# Allegro board mib_tongue2_m13.brd
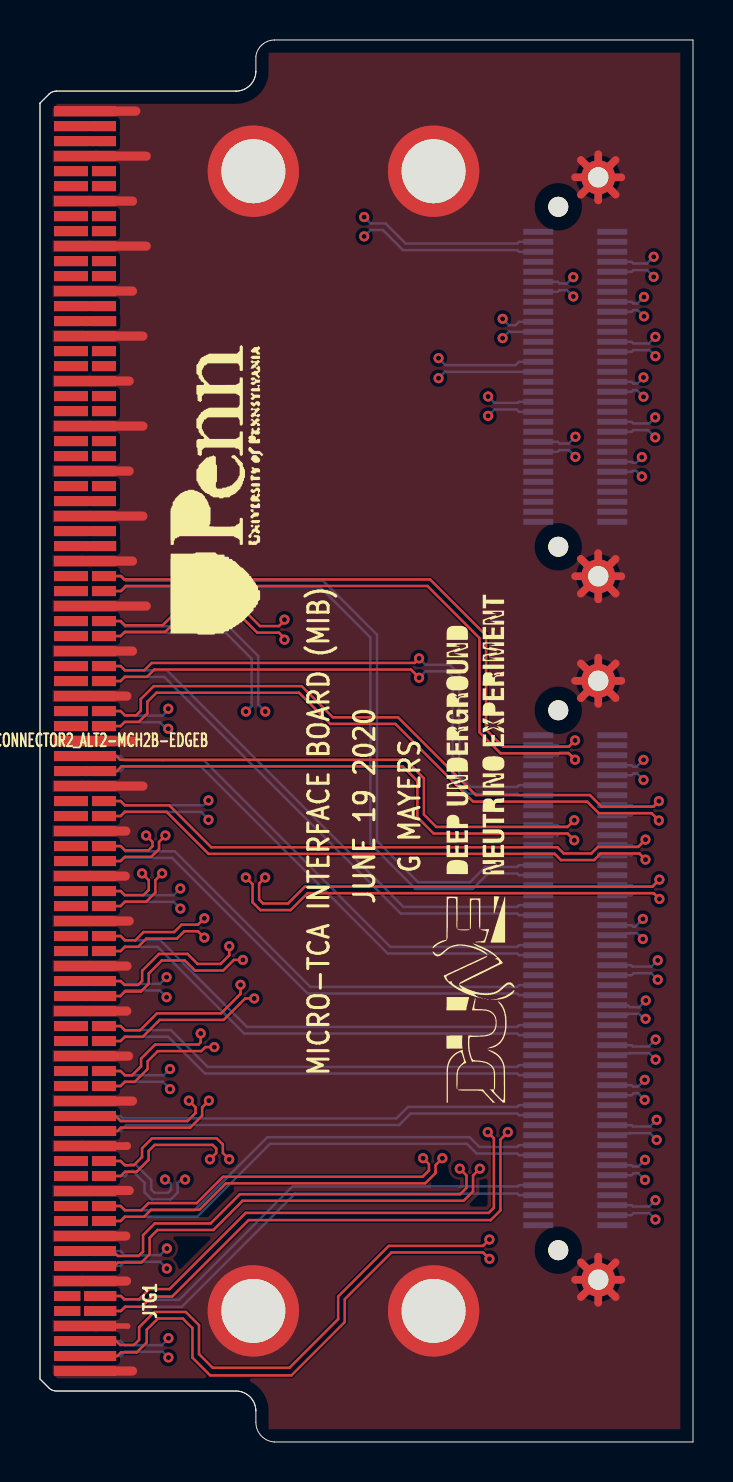
[diagram p0: board, top side]
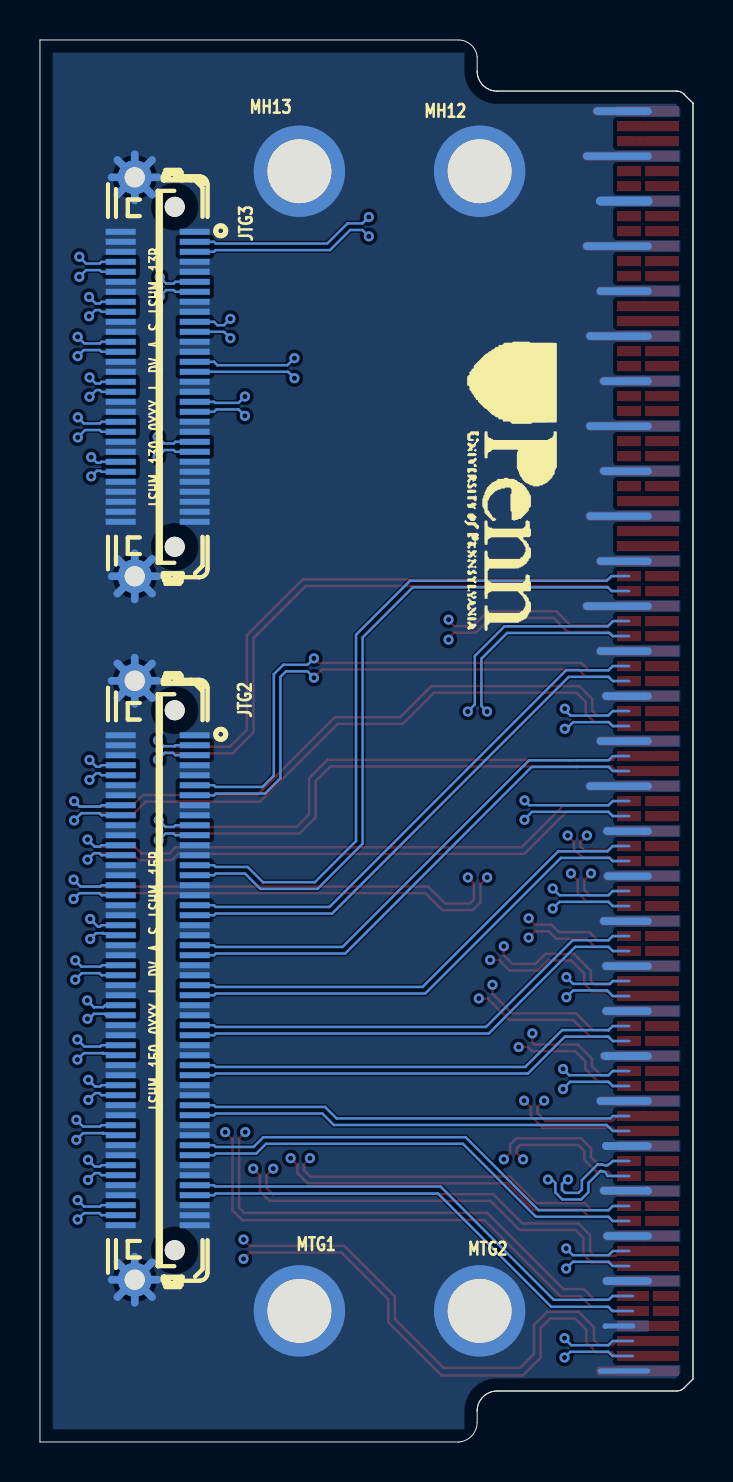
[diagram p1: board, bottom side, seen from below]

Outline 32.67 x 70.11 mm; copper layers: TOP, 02_GND, 03_SIG1, 04_GND, 05_PWR1, 06_GND, 07_SIG2, 08_GND, 09_SIG3, BOTTOM. Coordinates in mm from the lower left corner of the outline.
Outline path: 0,66.95 0.46,67.41 arc(0.62,67.51) 0.8,67.55 0.83,67.55 9.8,67.55 arc(10.51,67.84) 10.8,68.55 10.8,69.29 arc(11.11,69.88) 11.73,70.11 32.67,70.11 32.67,0 11.72,0 arc(11.06,0.31) 10.8,0.98 10.8,1.56 arc(10.5,2.26) 9.8,2.55 0.8,2.55 arc(0.62,2.59) 0.46,2.69 0,3.15 0,66.95

## Design rules (mm)
constraint set DEFAULT: min track width 0.127
net group BP.DATA_IN_N: nets BP.DATA_IN_N<0> BP.DATA_IN_N<1> BP.DATA_IN_N<2> BP.DATA_IN_N<3> BP.DATA_IN_N<4> BP.DATA_IN_N<5> BP.DATA_IN_N<6> BP.DATA_IN_N<7> BP.DATA_IN_N<8> BP.DATA_IN_N<9> BP.DATA_IN_N<10> BP.DATA_IN_N<11>
net group BP.DATA_IN_P: nets BP.DATA_IN_P<0> BP.DATA_IN_P<1> BP.DATA_IN_P<2> BP.DATA_IN_P<3> BP.DATA_IN_P<4> BP.DATA_IN_P<5> BP.DATA_IN_P<6> BP.DATA_IN_P<7> BP.DATA_IN_P<8> BP.DATA_IN_P<9> BP.DATA_IN_P<10> BP.DATA_IN_P<11>
net group BP.DATA_OUT_N: nets BP.DATA_OUT_N<0> BP.DATA_OUT_N<1> BP.DATA_OUT_N<2> BP.DATA_OUT_N<3> BP.DATA_OUT_N<4> BP.DATA_OUT_N<5> BP.DATA_OUT_N<6> BP.DATA_OUT_N<7> BP.DATA_OUT_N<8> BP.DATA_OUT_N<9> BP.DATA_OUT_N<10> BP.DATA_OUT_N<11>
net group BP.DATA_OUT_P: nets BP.DATA_OUT_P<0> BP.DATA_OUT_P<1> BP.DATA_OUT_P<2> BP.DATA_OUT_P<3> BP.DATA_OUT_P<4> BP.DATA_OUT_P<5> BP.DATA_OUT_P<6> BP.DATA_OUT_P<7> BP.DATA_OUT_P<8> BP.DATA_OUT_P<9> BP.DATA_OUT_P<10> BP.DATA_OUT_P<11>
net group BP.REF_CLK_N: nets BP.REF_CLK_N<0> BP.REF_CLK_N<1> BP.REF_CLK_N<2> BP.REF_CLK_N<3> BP.REF_CLK_N<4> BP.REF_CLK_N<5> BP.REF_CLK_N<6> BP.REF_CLK_N<7> BP.REF_CLK_N<8> BP.REF_CLK_N<9> BP.REF_CLK_N<10> BP.REF_CLK_N<11>
net group BP.REF_CLK_P: nets BP.REF_CLK_P<0> BP.REF_CLK_P<1> BP.REF_CLK_P<2> BP.REF_CLK_P<3> BP.REF_CLK_P<4> BP.REF_CLK_P<5> BP.REF_CLK_P<6> BP.REF_CLK_P<7> BP.REF_CLK_P<8> BP.REF_CLK_P<9> BP.REF_CLK_P<10> BP.REF_CLK_P<11>

## Placement (name value [footprint] x y rotation side)
JTG1  MCH_TG2-EDGE-170_ALT2  [AMC0_R2_BPLUS_PCB_EDGE]  2.25 35.05 0 top
JTG2  LSHM-150-03.0-L-DV-A-S-K-TR  [SAMTEC_LSHM-150-04-0-L-DV-A-S]  26.83 23.09 90 bottom
JTG3  LSHM-130-03.0-L-DV-A-S-K-TR  [SAMTEC_LSHM-130-04-0-L-DV-A-S]  26.83 53.27 90 bottom
MTG1  MT_HOLE  [MOUNTHOLE]  19.69 6.56 180 bottom
MTG2  MT_HOLE  [MOUNTHOLE]  10.67 6.56 180 bottom
MTG3  MT_HOLE  [MOUNTHOLE]  19.69 63.54 180 bottom
MTG4  MT_HOLE  [MOUNTHOLE]  10.67 63.54 180 bottom
NOREF  -  []  12.04 40.05 90 top
NOREF#2  -  []  153.74 -80.89 0 top
NOREF#3  -  []  0.77 67.55 0 top
NOREF#4  -  []  -27.5 38.33 0 top
NOREF#5  -  []  0.8 2.55 90 top
NOREF#6  -  []  -26.64 37.62 0 top
NOREF#7  -  []  32.67 0 90 top
NOREF#8  -  []  23.75 16.97 90 top
NOREF#9  -  []  -255.82 -185.32 0 top
NOREF#10  -  []  0 66.91 0 top
NOREF#11  -  []  -27.5 51.15 0 top
NOREF#12  -  []  12.32 55.35 270 bottom

## Library data of the parts
JTG1 = MCH_CONNECTOR2_ALT2: part number: MCH_CONNECTOR2_ALT2-MCH2B-EDGE-170,MCH_CONNECTOR2_ALT2
JTG2 = LSHM-150-0XXX-L-DV-A-S: part number: LSHM-150-0XXX-L-DV-A-S-LSHM-150-03.0-L-DV-A-S-K-TR,LSHM-150-0XXX-L-DV-A-S
JTG3 = LSHM-130-0XXX-L-DV-A-S: part number: LSHM-130-0XXX-L-DV-A-S-LSHM-130-03.0-L-DV-A-S-K-TR,LSHM-130-0XXX-L-DV-A-S
MTG1-MTG4 = MT_HOLE: part number: MT_HOLE-MT_HOLE,MT_HOLE

## Footprints (pads in the part's own frame, mm; a bottom-side part is the same pattern mirrored in y, then rotated)
AMC0_R2_BPLUS_PCB_EDGE
  rect 1.3x0.5 smd: (-0.888,21) (-0.888,9.75) (-0.888,-1.5) (-0.888,-12.75) (-0.888,-19.5) (-0.888,-26.25) (-0.888,-27.75) (-0.888,-27.75) (-0.888,-28.5) (-0.888,-28.5) (-0.888,-29.25) (-0.888,-30) (-0.888,-30.75)
  rect 1.7x0.5 smd: (-0.7,30.75) (-0.7,30) (-0.7,28.5) (-0.7,28.5) (-0.7,27.75) (-0.7,27.75) (-0.7,26.25) (-0.7,26.25) (-0.7,25.5) (-0.7,25.5) (-0.7,24) (-0.7,24) (-0.7,23.25) (-0.7,23.25) (-0.7,21.75) (-0.7,21) (-0.7,19.5) (-0.7,19.5) (-0.7,18.75) (-0.7,18.75) (-0.7,17.25) (-0.7,17.25) (-0.7,16.5) (-0.7,16.5) (-0.7,15) (-0.7,15) (-0.7,14.25) (-0.7,14.25) (-0.7,12.75) (-0.7,12.75) (-0.7,12) (-0.7,10.5) (-0.7,9.75) (-0.7,8.25) (-0.7,8.25) (-0.7,7.5) (-0.7,7.5) (-0.7,6) (-0.7,6) (-0.7,5.25) (-0.7,5.25) (-0.7,3.75) (-0.7,3.75) (-0.7,3) (-0.7,3) (-0.7,1.5) (-0.7,1.5) (-0.7,0.75) (-0.7,0.75) (-0.7,-0.75) (-0.7,-1.5) (-0.7,-3) (-0.7,-3) (-0.7,-3.75) (-0.7,-3.75) (-0.7,-5.25) (-0.7,-5.25) (-0.7,-6) (-0.7,-6) (-0.7,-7.5) (-0.7,-7.5) (-0.7,-8.25) (-0.7,-8.25) (-0.7,-9.75) (-0.7,-9.75) (-0.7,-10.5) (-0.7,-10.5) (-0.7,-12) (-0.7,-12.75) (-0.7,-14.25) (-0.7,-14.25) (-0.7,-15) (-0.7,-15) (-0.7,-16.5) (-0.7,-16.5) (-0.7,-17.25) (-0.7,-17.25) (-0.7,-18.75) (-0.7,-19.5) (-0.7,-21) (-0.7,-21) (-0.7,-21.75) (-0.7,-21.75) (-0.7,-23.25) (-0.7,-23.25) (-0.7,-24) (-0.7,-24) (-0.7,-25.5) (-0.7,-26.25)
  rect 2x0.5 smd: (-0.55,30) (-0.55,-30)
  rect 3.1x0.5 smd: 1(0,-31.5) 2(0,-30.75) 4(0,-29.25) 7(0,-27) 9(0,-25.5) 10(0,-24.75) 13(0,-22.5) 16(0,-20.25) 18(0,-18.75) 19(0,-18) 22(0,-15.75) 25(0,-13.5) 27(0,-12) 28(0,-11.25) 31(0,-9) 34(0,-6.75) 37(0,-4.5) 40(0,-2.25) 42(0,-0.75) 43(0,0) 46(0,2.25) 49(0,4.5) 52(0,6.75) 55(0,9) 57(0,10.5) 58(0,11.25) 61(0,13.5) 64(0,15.75) 67(0,18) 70(0,20.25) 72(0,21.75) 73(0,22.5) 76(0,24.75) 79(0,27) 82(0,29.25) 84(0,30.75) 85(0,31.5) 86(0,31.5) 89(0,29.25) 92(0,27) 95(0,24.75) 98(0,22.5) 101(0,20.25) 104(0,18) 107(0,15.75) 110(0,13.5) 112(0,12) 113(0,11.25) 116(0,9) 119(0,6.75) 122(0,4.5) 125(0,2.25) 128(0,0) 131(0,-2.25) 134(0,-4.5) 137(0,-6.75) 140(0,-9) 143(0,-11.25) 146(0,-13.5) 149(0,-15.75) 152(0,-18) 155(0,-20.25) 158(0,-22.5) 161(0,-24.75) 164(0,-27) 170(0,-31.5)
  rect 0.9x0.5 smd: 3(1.1,-30) 83(1.1,30)
  rect 1.6x0.5 smd: 5(0.762,-28.5) 6(0.762,-27.75) 8(0.762,-26.25) 17(0.762,-19.5) 26(0.762,-12.75) 41(0.762,-1.5) 56(0.762,9.75) 71(0.762,21) 165(0.762,-27.75) 166(0.762,-28.5) 167(0.762,-29.25) 168(0.762,-30) 169(0.762,-30.75)
  rect 1.2x0.5 smd: 11(0.95,-24) 12(0.95,-23.25) 14(0.95,-21.75) 15(0.95,-21) 20(0.95,-17.25) 21(0.95,-16.5) 23(0.95,-15) 24(0.95,-14.25) 29(0.95,-10.5) 30(0.95,-9.75) 32(0.95,-8.25) 33(0.95,-7.5) 35(0.95,-6) 36(0.95,-5.25) 38(0.95,-3.75) 39(0.95,-3) 44(0.95,0.75) 45(0.95,1.5) 47(0.95,3) 48(0.95,3.75) 50(0.95,5.25) 51(0.95,6) 53(0.95,7.5) 54(0.95,8.25) 59(0.95,12) 60(0.95,12.75) 62(0.95,14.25) 63(0.95,15) 65(0.95,16.5) 66(0.95,17.25) 68(0.95,18.75) 69(0.95,19.5) 74(0.95,23.25) 75(0.95,24) 77(0.95,25.5) 78(0.95,26.25) 80(0.95,27.75) 81(0.95,28.5) 87(0.95,30.75) 88(0.95,30) 90(0.95,28.5) 91(0.95,27.75) 93(0.95,26.25) 94(0.95,25.5) 96(0.95,24) 97(0.95,23.25) 99(0.95,21.75) 100(0.95,21) 102(0.95,19.5) 103(0.95,18.75) 105(0.95,17.25) 106(0.95,16.5) 108(0.95,15) 109(0.95,14.25) 111(0.95,12.75) 114(0.95,10.5) 115(0.95,9.75) 117(0.95,8.25) 118(0.95,7.5) 120(0.95,6) 121(0.95,5.25) 123(0.95,3.75) 124(0.95,3) 126(0.95,1.5) 127(0.95,0.75) 129(0.95,-0.75) 130(0.95,-1.5) 132(0.95,-3) 133(0.95,-3.75) 135(0.95,-5.25) 136(0.95,-6) 138(0.95,-7.5) 139(0.95,-8.25) 141(0.95,-9.75) 142(0.95,-10.5) 144(0.95,-12) 145(0.95,-12.75) 147(0.95,-14.25) 148(0.95,-15) 150(0.95,-16.5) 151(0.95,-17.25) 153(0.95,-18.75) 154(0.95,-19.5) 156(0.95,-21) 157(0.95,-21.75) 159(0.95,-23.25) 160(0.95,-24) 162(0.95,-25.5) 163(0.95,-26.25)
MOUNTHOLE
  round 4.572 hole 3.2: 1(0,0)
SAMTEC_LSHM-130-04-0-L-DV-A-S
  round 1 hole 1.45 unplated: (-8.5,-0.9) (8.5,-0.9)
  rect 0.3x1.5 smd: 1(7.25,-1.9) 2(7.25,1.8) 3(6.75,-1.9) 4(6.75,1.8) 5(6.25,-1.9) 6(6.25,1.8) 7(5.75,-1.9) 8(5.75,1.8) 9(5.25,-1.9) 10(5.25,1.8) 11(4.75,-1.9) 12(4.75,1.8) 13(4.25,-1.9) 14(4.25,1.8) 15(3.75,-1.9) 16(3.75,1.8) 17(3.25,-1.9) 18(3.25,1.8) 19(2.75,-1.9) 20(2.75,1.8) 21(2.25,-1.9) 22(2.25,1.8) 23(1.75,-1.9) 24(1.75,1.8) 25(1.25,-1.9) 26(1.25,1.8) 27(0.75,-1.9) 28(0.75,1.8) 29(0.25,-1.9) 30(0.25,1.8) 31(-0.25,-1.9) 32(-0.25,1.8) 33(-0.75,-1.9) 34(-0.75,1.8) 35(-1.25,-1.9) 36(-1.25,1.8) 37(-1.75,-1.9) 38(-1.75,1.8) 39(-2.25,-1.9) 40(-2.25,1.8) 41(-2.75,-1.9) 42(-2.75,1.8) 43(-3.25,-1.9) 44(-3.25,1.8) 45(-3.75,-1.9) 46(-3.75,1.8) 47(-4.25,-1.9) 48(-4.25,1.8) 49(-4.75,-1.9) 50(-4.75,1.8) 51(-5.25,-1.9) 52(-5.25,1.8) 53(-5.75,-1.9) 54(-5.75,1.8) 55(-6.25,-1.9) 56(-6.25,1.8) 57(-6.75,-1.9) 58(-6.75,1.8) 59(-7.25,-1.9) 60(-7.25,1.8)
  round 1.702 hole 1.016: 61(-9.975,1.1) 62(9.975,1.1)
SAMTEC_LSHM-150-04-0-L-DV-A-S
  round 1 hole 1.45 unplated: (-13.5,-0.9) (13.5,-0.9)
  rect 0.3x1.5 smd: 1(12.25,-1.9) 2(12.25,1.8) 3(11.75,-1.9) 4(11.75,1.8) 5(11.25,-1.9) 6(11.25,1.8) 7(10.75,-1.9) 8(10.75,1.8) 9(10.25,-1.9) 10(10.25,1.8) 11(9.75,-1.9) 12(9.75,1.8) 13(9.25,-1.9) 14(9.25,1.8) 15(8.75,-1.9) 16(8.75,1.8) 17(8.25,-1.9) 18(8.25,1.8) 19(7.75,-1.9) 20(7.75,1.8) 21(7.25,-1.9) 22(7.25,1.8) 23(6.75,-1.9) 24(6.75,1.8) 25(6.25,-1.9) 26(6.25,1.8) 27(5.75,-1.9) 28(5.75,1.8) 29(5.25,-1.9) 30(5.25,1.8) 31(4.75,-1.9) 32(4.75,1.8) 33(4.25,-1.9) 34(4.25,1.8) 35(3.75,-1.9) 36(3.75,1.8) 37(3.25,-1.9) 38(3.25,1.8) 39(2.75,-1.9) 40(2.75,1.8) 41(2.25,-1.9) 42(2.25,1.8) 43(1.75,-1.9) 44(1.75,1.8) 45(1.25,-1.9) 46(1.25,1.8) 47(0.75,-1.9) 48(0.75,1.8) 49(0.25,-1.9) 50(0.25,1.8) 51(-0.25,-1.9) 52(-0.25,1.8) 53(-0.75,-1.9) 54(-0.75,1.8) 55(-1.25,-1.9) 56(-1.25,1.8) 57(-1.75,-1.9) 58(-1.75,1.8) 59(-2.25,-1.9) 60(-2.25,1.8) 61(-2.75,-1.9) 62(-2.75,1.8) 63(-3.25,-1.9) 64(-3.25,1.8) 65(-3.75,-1.9) 66(-3.75,1.8) 67(-4.25,-1.9) 68(-4.25,1.8) 69(-4.75,-1.9) 70(-4.75,1.8) 71(-5.25,-1.9) 72(-5.25,1.8) 73(-5.75,-1.9) 74(-5.75,1.8) 75(-6.25,-1.9) 76(-6.25,1.8) 77(-6.75,-1.9) 78(-6.75,1.8) 79(-7.25,-1.9) 80(-7.25,1.8) 81(-7.75,-1.9) 82(-7.75,1.8) 83(-8.25,-1.9) 84(-8.25,1.8) 85(-8.75,-1.9) 86(-8.75,1.8) 87(-9.25,-1.9) 88(-9.25,1.8) 89(-9.75,-1.9) 90(-9.75,1.8) 91(-10.25,-1.9) 92(-10.25,1.8) 93(-10.75,-1.9) 94(-10.75,1.8) 95(-11.25,-1.9) 96(-11.25,1.8) 97(-11.75,-1.9) 98(-11.75,1.8) 99(-12.25,-1.9) 100(-12.25,1.8)
  round 1.702 hole 1.016: 101(-14.975,1.1) 102(14.975,1.1)

## Nets
GND: JTG1.1 JTG1.4 JTG1.7 JTG1.10 JTG1.13 JTG1.16 JTG1.19 JTG1.22 JTG1.25 JTG1.28 JTG1.31 JTG1.34 JTG1.37 JTG1.40 JTG1.43 JTG1.46 JTG1.49 JTG1.52 JTG1.55 JTG1.58 JTG1.61 JTG1.64 JTG1.67 JTG1.70 JTG1.73 JTG1.76 JTG1.79 JTG1.82 JTG1.85 JTG1.86 JTG1.89 JTG1.92 JTG1.95 JTG1.98 JTG1.101 JTG1.104 JTG1.107 JTG1.110 JTG1.113 JTG1.116 JTG1.119 JTG1.122 JTG1.125 JTG1.128 JTG1.131 JTG1.134 JTG1.137 JTG1.140 JTG1.143 JTG1.146 JTG1.149 JTG1.152 JTG1.155 JTG1.158 JTG1.161 JTG1.164 JTG1.167 JTG1.170 JTG2.1 JTG2.2 JTG2.4 JTG2.6 JTG2.7 JTG2.9 JTG2.12 JTG2.14 JTG2.15 JTG2.17 JTG2.20 JTG2.22 JTG2.23 JTG2.25 JTG2.28 JTG2.30 JTG2.31 JTG2.33 JTG2.36 JTG2.38 JTG2.39 JTG2.41 JTG2.44 JTG2.46 JTG2.47 JTG2.49 JTG2.52 JTG2.54 JTG2.55 JTG2.57 JTG2.60 JTG2.62 JTG2.63 JTG2.65 JTG2.68 JTG2.70 JTG2.71 JTG2.73 JTG2.76 JTG2.78 JTG2.79 JTG2.81 JTG2.84 JTG2.86 JTG2.87 JTG2.89 JTG2.92 JTG2.94 JTG2.95 JTG2.97 JTG2.99 JTG2.100 JTG2.101 JTG2.102(F2) JTG3.1 JTG3.2 JTG3.4 JTG3.6 JTG3.7 JTG3.9 JTG3.12 JTG3.14 JTG3.15 JTG3.17 JTG3.20 JTG3.22 JTG3.23 JTG3.25 JTG3.28 JTG3.30 JTG3.31 JTG3.33 JTG3.36 JTG3.38 JTG3.39 JTG3.41 JTG3.44 JTG3.46 JTG3.47 JTG3.49 JTG3.51 JTG3.52 JTG3.53 JTG3.54 JTG3.55 JTG3.56 JTG3.57 JTG3.58 JTG3.59 JTG3.60 JTG3.61 JTG3.62(F2) MTG1.1(MH_SIG) MTG2.1(MH_SIG) MTG3.1(MH_SIG) MTG4.1(MH_SIG)
BP.DATA_IN_N<0>: JTG1.53 JTG2.5
BP.DATA_IN_N<1>: JTG1.50 JTG2.10
BP.DATA_IN_N<2>: JTG1.47 JTG2.13
BP.DATA_IN_N<3>: JTG1.44 JTG2.18
BP.DATA_IN_N<4>: JTG1.41 JTG2.21
BP.DATA_IN_N<5>: JTG1.38 JTG2.26
BP.DATA_IN_N<6>: JTG1.118 JTG2.29
BP.DATA_IN_N<7>: JTG1.121 JTG2.34
BP.DATA_IN_N<8>: JTG1.124 JTG2.37
BP.DATA_IN_N<9>: JTG1.127 JTG2.42
BP.DATA_IN_N<10>: JTG1.130 JTG2.45
BP.DATA_IN_N<11>: JTG1.133 JTG2.50
BP.DATA_IN_P<0>: JTG1.54 JTG2.3
BP.DATA_IN_P<1>: JTG1.51 JTG2.8
BP.DATA_IN_P<2>: JTG1.48 JTG2.11
BP.DATA_IN_P<3>: JTG1.45 JTG2.16
BP.DATA_IN_P<4>: JTG1.42 JTG2.19
BP.DATA_IN_P<5>: JTG1.39 JTG2.24
BP.DATA_IN_P<6>: JTG1.117 JTG2.27
BP.DATA_IN_P<7>: JTG1.120 JTG2.32
BP.DATA_IN_P<8>: JTG1.123 JTG2.35
BP.DATA_IN_P<9>: JTG1.126 JTG2.40
BP.DATA_IN_P<10>: JTG1.129 JTG2.43
BP.DATA_IN_P<11>: JTG1.132 JTG2.48
BP.DATA_OUT_N<0>: JTG1.136 JTG2.53
BP.DATA_OUT_N<1>: JTG1.139 JTG2.58
BP.DATA_OUT_N<2>: JTG1.142 JTG2.61
BP.DATA_OUT_N<3>: JTG1.145 JTG2.66
BP.DATA_OUT_N<4>: JTG1.148 JTG2.69
BP.DATA_OUT_N<5>: JTG1.151 JTG2.74
BP.DATA_OUT_N<6>: JTG1.154 JTG2.77
BP.DATA_OUT_N<7>: JTG1.157 JTG2.82
BP.DATA_OUT_N<8>: JTG1.160 JTG2.85
BP.DATA_OUT_N<9>: JTG1.163 JTG2.90
BP.DATA_OUT_N<10>: JTG1.166 JTG2.93
BP.DATA_OUT_N<11>: JTG1.169 JTG2.98
BP.DATA_OUT_P<0>: JTG1.135 JTG2.51
BP.DATA_OUT_P<1>: JTG1.138 JTG2.56
BP.DATA_OUT_P<2>: JTG1.141 JTG2.59
BP.DATA_OUT_P<3>: JTG1.144 JTG2.64
BP.DATA_OUT_P<4>: JTG1.147 JTG2.67
BP.DATA_OUT_P<5>: JTG1.150 JTG2.72
BP.DATA_OUT_P<6>: JTG1.153 JTG2.75
BP.DATA_OUT_P<7>: JTG1.156 JTG2.80
BP.DATA_OUT_P<8>: JTG1.159 JTG2.83
BP.DATA_OUT_P<9>: JTG1.162 JTG2.88
BP.DATA_OUT_P<10>: JTG1.165 JTG2.91
BP.DATA_OUT_P<11>: JTG1.168 JTG2.96
BP.REF_CLK_N<0>: JTG1.35 JTG3.5
BP.REF_CLK_N<1>: JTG1.32 JTG3.10
BP.REF_CLK_N<2>: JTG1.29 JTG3.13
BP.REF_CLK_N<3>: JTG1.26 JTG3.18
BP.REF_CLK_N<4>: JTG1.23 JTG3.21
BP.REF_CLK_N<5>: JTG1.20 JTG3.26
BP.REF_CLK_N<6>: JTG1.17 JTG3.29
BP.REF_CLK_N<7>: JTG1.14 JTG3.34
BP.REF_CLK_N<8>: JTG1.11 JTG3.37
BP.REF_CLK_N<9>: JTG1.8 JTG3.42
BP.REF_CLK_N<10>: JTG1.5 JTG3.45
BP.REF_CLK_N<11>: JTG1.2 JTG3.50
BP.REF_CLK_P<0>: JTG1.36 JTG3.3
BP.REF_CLK_P<1>: JTG1.33 JTG3.8
BP.REF_CLK_P<2>: JTG1.30 JTG3.11
BP.REF_CLK_P<3>: JTG1.27 JTG3.16
BP.REF_CLK_P<4>: JTG1.24 JTG3.19
BP.REF_CLK_P<5>: JTG1.21 JTG3.24
BP.REF_CLK_P<6>: JTG1.18 JTG3.27
BP.REF_CLK_P<7>: JTG1.15 JTG3.32
BP.REF_CLK_P<8>: JTG1.12 JTG3.35
BP.REF_CLK_P<9>: JTG1.9(TXFUB-) JTG3.40
BP.REF_CLK_P<10>: JTG1.6 JTG3.43
BP.REF_CLK_P<11>: JTG1.3 JTG3.48

Pads without a net: JTG1 56 57 59 60 62 63 65 66 68 69 71 72 74 75 77 78 80 81 83 84 87 88 90 91 93 94 96 97 99 100 102 103 105 106 108 109 111 112 114 115

## Via types
v1: diameter 0.508, hole 0.254, TOP to BOTTOM, 100 vias

## Routing (per net, layer and track width the routed paths; a pad name or vN(x,y) marks a point on that pad's centre or on a via; arc(x,y) is an arc through that point)
GND: length 443.9
  TOP w0.254: JTG1.4 4.38,5.8 4.4,5.79
  TOP w0.381: JTG1.16 4.35,14.8 4.36,14.81 ; 27.06,7.25 JTG2.101 ; JTG2.101 27.06,8.98 ; JTG2.101 26.77,8.12 ; JTG2.101 28.79,7.25 ; JTG2.101 28.79,8.98 ; JTG2.101 29.08,8.12 ; JTG2.101 27.93,6.96 ; JTG2.101 27.93,9.27 ; 27.06,37.2 JTG2.102 ; JTG2.102 27.93,39.22 ; JTG2.102 27.93,36.91 ; JTG2.102 27.06,38.93 ; JTG2.102 26.77,38.07 ; JTG2.102 28.79,38.93 ; JTG2.102 28.79,37.2 ; JTG2.102 29.08,38.07 ; 26.77,63.24 JTG3.62 ; JTG3.62 28.79,62.37 ; JTG3.62 27.06,62.37 ; JTG3.62 28.79,64.11 ; JTG3.62 27.93,62.08 ; JTG3.62 27.06,64.11 ; JTG3.62 27.93,64.4 ; JTG3.62 29.08,63.24 ; JTG3.61 28.79,44.16 ; JTG3.61 29.08,43.29 ; JTG3.61 27.93,44.45 ; JTG3.61 26.77,43.29 ; JTG3.61 27.06,44.16 ; JTG3.61 27.06,42.42 ; JTG3.61 28.79,42.42 ; JTG3.61 27.93,42.13
  TOP w0.457: 4.63,17.05 JTG1.19 ; 4.34,21.55 JTG1.25 ; 4.43,19.3 JTG1.22 ; 5.15,32.8 JTG1.40 ; 5.31,41.8 JTG1.52 ; 4.63,44.05 JTG1.55 ; 5.15,50.8 JTG1.64 ; 4.79,66.55 JTG1.85 ; 5.31,59.8 JTG1.76 ; 4.63,62.05 JTG1.79 ; 4.29,30.55 JTG1.37 ; 4.46,48.55 JTG1.61 ; 4.35,37.3 JTG1.46 ; 4.35,23.8 JTG1.28 ; 5.15,46.3 JTG1.58 ; 5.15,55.3 JTG1.70 ; 4.63,35.05 JTG1.43 ; 4.27,28.3 JTG1.34 ; 4.33,8.05 JTG1.7 ; 5.31,64.3 JTG1.82 ; 4.3,10.3 JTG1.10 ; 4.46,26.05 JTG1.31 ; 4.63,39.55 JTG1.49 ; 4.63,57.55 JTG1.73 ; JTG1.13 3.7,12.55 3.73,12.57 4.46,12.57 ; 4.46,53.05 JTG1.67 ; 4.63,3.55 JTG1.1
  02_GND w0.381: 26.77,38.07 JTG2.102 ; JTG2.102 27.06,38.93 ; JTG2.102 29.08,38.07 ; JTG2.102 27.93,39.22 ; JTG2.102 27.93,36.91 ; JTG2.102 28.79,38.93 ; JTG2.102 27.06,37.2 ; JTG2.102 28.79,37.2 ; 26.77,8.12 JTG2.101 ; JTG2.101 27.93,9.27 ; JTG2.101 28.79,8.98 ; JTG2.101 27.06,7.25 ; JTG2.101 27.93,6.96 ; JTG2.101 29.08,8.12 ; JTG2.101 27.06,8.98 ; JTG2.101 28.79,7.25 ; 26.77,43.29 JTG3.61 ; JTG3.61 28.79,42.42 ; JTG3.61 29.08,43.29 ; JTG3.61 28.79,44.16 ; JTG3.61 27.06,42.42 ; JTG3.61 27.93,44.45 ; JTG3.61 27.06,44.16 ; JTG3.61 27.93,42.13 ; JTG3.62 29.08,63.24 ; JTG3.62 27.06,62.37 ; JTG3.62 26.77,63.24 ; JTG3.62 28.79,62.37 ; JTG3.62 27.06,64.11 ; JTG3.62 28.79,64.11 ; JTG3.62 27.93,64.4 ; JTG3.62 27.93,62.08
  04_GND w0.381: 27.06,42.42 JTG3.61 ; JTG3.61 29.08,43.29 ; JTG3.61 26.77,43.29 ; JTG3.61 27.93,42.13 ; JTG3.61 27.06,44.16 ; JTG3.61 28.79,42.42 ; JTG3.61 27.93,44.45 ; JTG3.61 28.79,44.16 ; 26.77,63.24 JTG3.62 ; JTG3.62 28.79,64.11 ; JTG3.62 27.06,62.37 ; JTG3.62 27.93,62.08 ; JTG3.62 28.79,62.37 ; JTG3.62 27.06,64.11 ; JTG3.62 29.08,63.24 ; JTG3.62 27.93,64.4 ; 26.77,38.07 JTG2.102 ; JTG2.102 28.79,38.93 ; JTG2.102 27.06,38.93 ; JTG2.102 29.08,38.07 ; JTG2.102 27.06,37.2 ; JTG2.102 27.93,39.22 ; JTG2.102 27.93,36.91 ; JTG2.102 28.79,37.2 ; JTG2.101 28.79,8.98 ; JTG2.101 27.93,9.27 ; JTG2.101 28.79,7.25 ; JTG2.101 27.93,6.96 ; JTG2.101 27.06,8.98 ; JTG2.101 29.08,8.12 ; JTG2.101 27.06,7.25 ; JTG2.101 26.77,8.12
  05_PWR1 w0.381: JTG3.62 29.08,63.24 ; JTG3.62 27.06,62.37 ; JTG3.62 27.93,64.4 ; JTG3.62 28.79,64.11 ; JTG3.62 26.77,63.24 ; JTG3.62 28.79,62.37 ; JTG3.62 27.93,62.08 ; JTG3.62 27.06,64.11 ; 27.06,37.2 JTG2.102 ; JTG2.102 26.77,38.07 ; JTG2.102 27.93,39.22 ; JTG2.102 27.93,36.91 ; JTG2.102 28.79,37.2 ; JTG2.102 27.06,38.93 ; JTG2.102 28.79,38.93 ; JTG2.102 29.08,38.07 ; 27.93,6.96 JTG2.101 ; JTG2.101 28.79,7.25 ; JTG2.101 29.08,8.12 ; JTG2.101 27.06,8.98 ; JTG2.101 27.06,7.25 ; JTG2.101 27.93,9.27 ; JTG2.101 28.79,8.98 ; JTG2.101 26.77,8.12 ; 27.06,44.16 JTG3.61 ; JTG3.61 29.08,43.29 ; JTG3.61 28.79,42.42 ; JTG3.61 26.77,43.29 ; JTG3.61 28.79,44.16 ; JTG3.61 27.06,42.42 ; JTG3.61 27.93,42.13 ; JTG3.61 27.93,44.45
  06_GND w0.381: JTG2.101 28.79,8.98 ; JTG2.101 27.93,6.96 ; JTG2.101 27.93,9.27 ; JTG2.101 27.06,8.98 ; JTG2.101 28.79,7.25 ; JTG2.101 26.77,8.12 ; JTG2.101 27.06,7.25 ; JTG2.101 29.08,8.12 ; JTG3.62 28.79,62.37 ; JTG3.62 27.93,64.4 ; JTG3.62 26.77,63.24 ; JTG3.62 27.93,62.08 ; JTG3.62 27.06,64.11 ; JTG3.62 29.08,63.24 ; JTG3.62 28.79,64.11 ; JTG3.62 27.06,62.37 ; 27.93,42.13 JTG3.61 ; JTG3.61 28.79,44.16 ; JTG3.61 27.06,42.42 ; JTG3.61 28.79,42.42 ; JTG3.61 26.77,43.29 ; JTG3.61 27.06,44.16 ; JTG3.61 29.08,43.29 ; JTG3.61 27.93,44.45 ; 26.77,38.07 JTG2.102 ; JTG2.102 27.06,37.2 ; JTG2.102 28.79,38.93 ; JTG2.102 29.08,38.07 ; JTG2.102 27.93,36.91 ; JTG2.102 28.79,37.2 ; JTG2.102 27.06,38.93 ; JTG2.102 27.93,39.22
  08_GND w0.381: JTG3.62 29.08,63.24 ; JTG3.62 27.06,62.37 ; JTG3.62 26.77,63.24 ; JTG3.62 28.79,64.11 ; JTG3.62 27.93,64.4 ; JTG3.62 27.93,62.08 ; JTG3.62 28.79,62.37 ; JTG3.62 27.06,64.11 ; 27.93,42.13 JTG3.61 ; JTG3.61 26.77,43.29 ; JTG3.61 28.79,42.42 ; JTG3.61 27.06,44.16 ; JTG3.61 29.08,43.29 ; JTG3.61 27.06,42.42 ; JTG3.61 27.93,44.45 ; JTG3.61 28.79,44.16 ; 27.93,6.96 JTG2.101 ; JTG2.101 27.06,8.98 ; JTG2.101 27.93,9.27 ; JTG2.101 26.77,8.12 ; JTG2.101 27.06,7.25 ; JTG2.101 28.79,8.98 ; JTG2.101 28.79,7.25 ; JTG2.101 29.08,8.12 ; JTG2.102 29.08,38.07 ; JTG2.102 27.06,38.93 ; JTG2.102 27.93,39.22 ; JTG2.102 28.79,37.2 ; JTG2.102 28.79,38.93 ; JTG2.102 27.06,37.2 ; JTG2.102 26.77,38.07 ; JTG2.102 27.93,36.91
  09_SIG3 w0.381: 27.93,62.08 JTG3.62 ; JTG3.62 27.06,64.11 ; JTG3.62 26.77,63.24 ; JTG3.62 27.06,62.37 ; JTG3.62 28.79,62.37 ; JTG3.62 27.93,64.4 ; JTG3.62 29.08,63.24 ; JTG3.62 28.79,64.11 ; 27.93,42.13 JTG3.61 ; JTG3.61 28.79,44.16 ; JTG3.61 26.77,43.29 ; JTG3.61 27.93,44.45 ; JTG3.61 27.06,44.16 ; JTG3.61 27.06,42.42 ; JTG3.61 28.79,42.42 ; JTG3.61 29.08,43.29 ; JTG2.101 28.79,7.25 ; JTG2.101 27.93,6.96 ; JTG2.101 28.79,8.98 ; JTG2.101 27.06,8.98 ; JTG2.101 29.08,8.12 ; JTG2.101 26.77,8.12 ; JTG2.101 27.93,9.27 ; JTG2.101 27.06,7.25 ; 27.06,38.93 JTG2.102 ; JTG2.102 26.77,38.07 ; JTG2.102 27.93,39.22 ; JTG2.102 28.79,38.93 ; JTG2.102 27.06,37.2 ; JTG2.102 28.79,37.2 ; JTG2.102 27.93,36.91 ; JTG2.102 29.08,38.07
  BOTTOM w0.254: 4.4,5.79 4.38,5.8 JTG1.167 ; JTG1.1 4.63,3.55
  BOTTOM w0.381: 4.43,19.3 JTG1.22 ; JTG2.102 28.79,38.93 ; JTG2.102 27.93,39.22 ; JTG2.102 28.79,37.2 ; JTG2.102 27.06,37.2 ; JTG2.102 26.77,38.07 ; JTG2.102 27.06,38.93 ; JTG2.102 27.93,36.91 ; JTG2.102 29.08,38.07 ; 27.06,62.37 JTG3.62 ; JTG3.62 29.08,63.24 ; JTG3.62 28.79,64.11 ; JTG3.62 27.93,62.08 ; JTG3.62 28.79,62.37 ; JTG3.62 26.77,63.24 ; JTG3.62 27.06,64.11 ; JTG3.62 27.93,64.4 ; 27.93,6.96 JTG2.101 ; JTG2.101 28.79,7.25 ; JTG2.101 26.77,8.12 ; JTG2.101 28.79,8.98 ; JTG2.101 27.06,7.25 ; JTG2.101 27.06,8.98 ; JTG2.101 29.08,8.12 ; JTG2.101 27.93,9.27 ; 4.29,30.55 JTG1.37 ; 5.15,32.8 JTG1.40 ; JTG3.61 27.93,44.45 ; JTG3.61 27.06,44.16 ; JTG3.61 28.79,44.16 ; JTG3.61 27.06,42.42 ; JTG3.61 26.77,43.29 ; JTG3.61 27.93,42.13 ; JTG3.61 28.79,42.42 ; JTG3.61 29.08,43.29 ; 4.46,48.55 JTG1.61 ; 4.63,57.55 JTG1.73 ; 4.3,10.3 JTG1.10 ; 4.79,66.55 JTG1.85 ; 4.27,28.3 JTG1.34 ; 5.31,59.8 JTG1.76 ; 4.46,53.05 JTG1.67 ; 4.34,21.55 JTG1.25 ; JTG1.13 2.28,12.57 4.46,12.57 ; 5.31,41.8 JTG1.52 ; 4.63,44.05 JTG1.55 ; 5.15,55.3 JTG1.70 ; 4.46,26.05 JTG1.31 ; 4.35,23.8 JTG1.28 ; 5.15,50.8 JTG1.64 ; 4.33,8.05 JTG1.7 ; 5.31,64.3 JTG1.82 ; 4.35,37.3 JTG1.46 ; 4.63,17.05 JTG1.19 ; JTG1.16 4.35,14.8 4.36,14.81 ; 5.15,46.3 JTG1.58 ; 4.63,39.55 JTG1.49 ; 4.63,35.05 JTG1.43
  BOTTOM w0.457: 4.63,62.05 JTG1.79
BP.DATA_IN_N<0>: length 32.1
  TOP w0.127: JTG1.53 4.04,42.55 4.3,42.81 19.38,42.81 21.98,40.2 21.98,35.49 23.03,34.44 26.45,34.44 v1(26.76,34.12)
  BOTTOM w0.127: v1(26.76,34.12) 26.42,34.46 26.01,34.46 25.89,34.34 JTG2.5
BP.DATA_IN_N<1>: length 33.4
  TOP w0.127: JTG1.50 4.04,40.3 4.25,40.51 6.27,40.51 6.97,41.21 10.13,41.21 10.87,40.47 11.96,40.47 12.23,40.2 v1(12.23,40.12)
  03_SIG1 w0.127: v1(30.19,33.11) 29.86,33.44 28.71,33.44 28.01,32.74 22.28,32.74 14.57,40.46 12.57,40.46 v1(12.23,40.12)
  BOTTOM w0.127: JTG2.10 29.59,33.34 29.69,33.43 29.87,33.43 v1(30.19,33.11)
BP.DATA_IN_N<2>: length 27.8
  TOP w0.127: v1(18.96,38.22) 18.55,38.63 5.72,38.63 5.36,38.26 4.25,38.26 4.04,38.05 JTG1.47
  BOTTOM w0.127: JTG2.13 23.96,32.34 23.88,32.43 21.4,32.43 20.64,33.19 20.64,38.26 20.36,38.54 19.28,38.54 v1(18.96,38.22)
BP.DATA_IN_N<3>: length 34
  TOP w0.127: v1(30.96,31.08) 30.59,31.44 27.95,31.44 27.38,32.02 21.67,32.02 17.78,35.91 14.52,35.91 12.96,37.47 5.82,37.47 5.37,37.01 5.37,36.43 4.95,36.01 4.25,36.01 4.04,35.8 JTG1.44
  BOTTOM w0.127: JTG2.18 29.59,31.34 29.7,31.44 30.59,31.44 v1(30.96,31.08)
BP.DATA_IN_N<4>: length 28.4
  TOP w0.127: JTG1.41 3.84,33.55 4.08,33.78 18.14,33.78 18.88,33.05 18.88,31.24 19.69,30.43 26.39,30.43 v1(26.73,30.09)
  BOTTOM w0.127: v1(26.73,30.09) 26.39,30.43 25.98,30.43 25.89,30.34 JTG2.21
BP.DATA_IN_N<5>: length 30.3
  TOP w0.127: JTG1.38 4.04,31.3 4.25,31.51 6.33,31.51 8.43,29.41 25.75,29.41 26.06,29.1 27.72,29.1 28.05,29.43 29.99,29.43 v1(30.29,29.12)
  BOTTOM w0.127: v1(30.29,29.12) 29.97,29.44 29.7,29.44 29.59,29.34 JTG2.26
BP.DATA_IN_N<6>: length 34.4
  BOTTOM w0.127: JTG1.118 4.07,42.55 4.26,42.74 14.02,42.74 16.53,40.23 16.53,29.91 18.78,27.66 21.65,27.66 22.41,28.43 23.88,28.43 23.96,28.34 JTG2.29
BP.DATA_IN_N<7>: length 44.2
  TOP w0.127: v1(10.3,28.23) 10.63,27.89 10.63,26.99 11.02,26.6 12.54,26.6 13.39,27.44 30.7,27.44 v1(30.99,27.16)
  07_SIG2 w0.127: v1(10.3,28.23) 10.64,28.58 10.64,36.18 v1(10.3,36.53)
  BOTTOM w0.127: JTG1.121 4.01,40.3 4.17,40.46 9.3,40.46 10.59,39.17 10.59,36.81 v1(10.3,36.53) ; v1(30.99,27.16) 30.7,27.44 29.7,27.44 29.59,27.34 JTG2.34
BP.DATA_IN_N<8>: length 26.8
  BOTTOM w0.127: JTG2.37 23.96,26.34 23.88,26.43 18.05,26.43 6.21,38.26 4.23,38.26 4.02,38.05 JTG1.124
BP.DATA_IN_N<9>: length 33.5
  03_SIG1 w0.127: v1(30.16,25.15) 29.87,25.44 18.6,25.44 8.04,36 6.75,36 v1(6.42,35.67)
  BOTTOM w0.127: v1(30.16,25.15) 29.87,25.44 29.52,25.44 29.52,25.45 29.51,25.45 29.49,25.42 29.31,25.42 29.23,25.34 JTG2.42 ; v1(6.42,35.67) 6.32,35.67 5.99,35.99 4.21,35.99 4.02,35.8 JTG1.127
BP.DATA_IN_N<10>: length 25.7
  BOTTOM w0.127: JTG2.45 23.96,24.34 23.88,24.43 17.4,24.43 8.06,33.76 5.83,33.76 5.83,33.76 4.23,33.76 4.02,33.55 JTG1.130
BP.DATA_IN_N<11>: length 34
  03_SIG1 w0.127: v1(8.43,31.11) 8.71,31.39 10.14,31.39 18.09,23.45 30.57,23.45 v1(30.9,23.12)
  BOTTOM w0.127: v1(8.43,31.11) 8.43,31.14 8.06,31.51 4.23,31.51 4.02,31.3 JTG1.133 ; v1(30.9,23.12) 30.58,23.44 29.7,23.44 29.59,23.34 JTG2.50
BP.DATA_IN_P<0>: length 32
  TOP w0.127: JTG1.54 4.04,43.3 4.21,43.14 19.51,43.14 22.31,40.33 22.31,35.62 23.17,34.77 26.45,34.77 v1(26.76,35.08)
  BOTTOM w0.127: v1(26.76,35.08) 26.47,34.79 25.94,34.79 25.89,34.84 JTG2.3
BP.DATA_IN_P<1>: length 33.3
  TOP w0.127: v1(12.23,41.12) 12.23,41.07 11.96,40.8 11.01,40.8 10.27,41.54 6.83,41.54 6.13,40.84 4.25,40.84 4.04,41.05 JTG1.51
  03_SIG1 w0.127: v1(12.23,41.12) 12.57,40.79 14.7,40.79 22.42,33.07 27.87,33.07 28.57,33.77 29.86,33.77 v1(30.19,34.11)
  BOTTOM w0.127: v1(30.19,34.11) 29.85,33.76 29.67,33.76 29.59,33.84 JTG2.8
BP.DATA_IN_P<2>: length 27.7
  TOP w0.127: JTG1.48 4.04,38.8 4.25,38.59 5.22,38.59 5.59,38.96 18.74,38.96 v1(18.96,39.18)
  BOTTOM w0.127: v1(18.96,39.18) 19.28,38.87 20.5,38.87 20.97,38.39 20.97,33.33 21.54,32.76 23.88,32.76 23.96,32.84 JTG2.11
BP.DATA_IN_P<3>: length 33.9
  TOP w0.127: JTG1.45 4.04,36.55 4.25,36.34 4.81,36.34 5.04,36.57 5.04,37.15 5.69,37.8 13.09,37.8 13.37,37.52 13.37,37.52 14.65,36.24 17.92,36.24 21.8,32.35 27.51,32.35 28.09,31.77 30.69,31.77 v1(30.96,32.05)
  BOTTOM w0.127: JTG2.16 29.59,31.84 29.66,31.77 30.69,31.77 v1(30.96,32.05)
BP.DATA_IN_P<4>: length 29.1
  TOP w0.127: JTG1.42 3.82,34.3 4.01,34.11 18.28,34.11 19.21,33.19 19.21,31.38 19.82,30.76 26.39,30.76 v1(26.73,31.09)
  BOTTOM w0.127: JTG2.19 25.89,30.84 25.98,30.76 26.39,30.76 v1(26.73,31.09)
BP.DATA_IN_P<5>: length 30.3
  TOP w0.127: v1(30.29,30.12) 29.92,29.76 27.91,29.76 27.58,29.43 26.2,29.43 25.89,29.74 8.57,29.74 6.47,31.84 4.25,31.84 4.04,32.05 JTG1.39
  BOTTOM w0.127: v1(30.29,30.12) 29.94,29.77 29.66,29.77 29.59,29.84 JTG2.24
BP.DATA_IN_P<6>: length 34.5
  BOTTOM w0.127: JTG2.27 23.96,28.84 23.88,28.76 22.27,28.76 21.51,27.99 18.92,27.99 16.86,30.05 16.86,40.37 14.16,43.07 4.32,43.07 4.09,43.3 JTG1.117
BP.DATA_IN_P<7>: length 44.3
  TOP w0.127: v1(11.26,28.23) 10.96,27.93 10.96,27.13 11.16,26.93 12.4,26.93 13.25,27.77 30.64,27.77 v1(30.99,28.12)
  07_SIG2 w0.127: v1(11.27,36.53) 10.97,36.23 10.97,28.52 v1(11.26,28.23)
  BOTTOM w0.127: v1(30.99,28.12) 30.64,27.77 29.66,27.77 29.59,27.84 JTG2.32 ; JTG1.120 4,41.05 4.26,40.79 9.43,40.79 10.92,39.3 10.92,36.88 v1(11.27,36.53)
BP.DATA_IN_P<8>: length 26.8
  BOTTOM w0.127: JTG2.35 23.96,26.84 23.88,26.76 18.18,26.76 6.35,38.59 4.23,38.59 4.02,38.8 JTG1.123
BP.DATA_IN_P<9>: length 33.6
  03_SIG1 w0.127: v1(30.16,26.16) 29.78,25.77 18.73,25.77 8.18,36.33 6.75,36.33 v1(6.42,36.67)
  BOTTOM w0.127: JTG1.126 4.02,36.55 4.24,36.33 6.13,36.33 6.13,36.32 6.42,36.61 v1(6.42,36.67) ; JTG2.40 29.59,25.84 29.66,25.77 29.78,25.77 v1(30.16,26.16)
BP.DATA_IN_P<10>: length 25.7
  BOTTOM w0.127: JTG2.43 23.96,24.84 23.88,24.76 17.53,24.76 8.2,34.09 6.17,34.09 6.16,34.09 4.23,34.09 4.02,34.3 JTG1.129
BP.DATA_IN_P<11>: length 33.9
  03_SIG1 w0.127: v1(30.9,24.08) 30.64,23.83 18.27,23.83 10.32,31.78 8.61,31.78 8.43,31.96 v1(8.43,32.08)
  BOTTOM w0.127: v1(30.9,24.08) 30.59,23.77 29.63,23.77 29.57,23.84 JTG2.48 ; JTG1.132 4.02,32.05 4.23,31.84 8.19,31.84 v1(8.43,32.08)
BP.DATA_OUT_N<0>: length 24.6
  BOTTOM w0.127: JTG2.53 23.96,22.34 23.88,22.43 13.39,22.43 6.61,29.21 4.17,29.21 4.02,29.05 JTG1.136
BP.DATA_OUT_N<1>: length 31.7
  03_SIG1 w0.127: v1(7.02,26.67) 7.36,27.01 8.51,27.01 14.08,21.44 29.94,21.44 30.22,21.16 v1(30.29,21.16)
  BOTTOM w0.127: v1(7.02,26.67) 6.68,27.01 4.23,27.01 4.02,26.8 JTG1.139 ; v1(30.29,21.16) 30.22,21.16 29.96,21.41 29.44,21.41 29.37,21.34 JTG2.58
BP.DATA_OUT_N<2>: length 23.6
  BOTTOM w0.127: JTG2.61 23.96,20.34 23.88,20.43 10.22,20.43 5.88,24.76 4.23,24.76 4.02,24.55 JTG1.142
BP.DATA_OUT_N<3>: length 32.3
  03_SIG1 w0.127: v1(6.33,22.24) 6.67,22.58 7.93,22.58 11.39,19.12 20.95,19.12 21.6,19.76 27.28,19.76 27.55,19.5 30.42,19.5 v1(30.8,19.12)
  BOTTOM w0.127: v1(30.8,19.12) 30.47,19.44 29.52,19.44 29.52,19.45 29.51,19.45 29.49,19.42 29.31,19.42 29.23,19.34 JTG2.66 ; v1(6.33,22.24) 6,22.58 4.29,22.58 4.02,22.3 JTG1.145
BP.DATA_OUT_N<4>: length 22.6
  BOTTOM w0.127: JTG2.69 23.96,18.34 23.88,18.43 8.25,18.43 6.41,20.27 4.36,20.27 4.23,20.27 4.02,20.05 JTG1.148
BP.DATA_OUT_N<5>: length 29.6
  03_SIG1 w0.127: v1(30.25,17.11) 29.87,17.49 24.02,17.49 23.52,17.98 6.84,17.98 v1(6.5,17.65)
  BOTTOM w0.127: v1(30.25,17.11) 29.91,17.44 29.7,17.44 29.59,17.34 JTG2.74 ; v1(6.5,17.65) 6.5,17.66 6.15,18.01 4.23,18.01 4.02,17.8 JTG1.151
BP.DATA_OUT_N<6>: length 22.1
  BOTTOM w0.127: JTG2.77 23.96,16.34 23.88,16.43 18.54,16.43 17.97,15.85 4.32,15.85 4.02,15.55 JTG1.154
BP.DATA_OUT_N<7>: length 34.9
  03_SIG1 w0.127: v1(7.26,13.12) 6.92,13.46 6.92,14.64 8.12,15.84 20.94,15.84 21.43,16.33 27.44,16.33 28.33,15.43 30.52,15.43 v1(30.85,15.11)
  BOTTOM w0.127: v1(30.85,15.11) 30.51,15.44 29.52,15.44 29.52,15.45 29.51,15.45 29.49,15.42 29.31,15.42 29.23,15.34 JTG2.82 ; JTG1.157 4.27,13.3 4.4,13.5 4.61,13.55 4.64,13.55 5.23,12.96 5.23,12.49 5.59,12.13 6.54,12.13 6.89,12.48 6.89,12.95 7.06,13.12 v1(7.26,13.12)
BP.DATA_OUT_N<8>: length 23.6
  BOTTOM w0.127: JTG1.160 4.02,11.05 4.23,11.26 7.86,11.26 11.51,14.91 21.36,14.91 21.84,14.43 23.88,14.43 23.96,14.34 JTG2.85
BP.DATA_OUT_N<9>: length 31.2
  03_SIG1 w0.127: v1(30.26,13.11) 29.91,13.46 26.13,13.46 24.47,11.81 12.36,11.81 9.57,9.01 6.68,9.01 v1(6.35,8.67)
  BOTTOM w0.127: v1(6.35,8.67) 6.01,9.01 4.23,9.01 4.02,8.8 JTG1.163 ; JTG2.90 29.59,13.34 29.7,13.44 29.93,13.44 v1(30.26,13.11)
BP.DATA_OUT_N<10>: length 24.4
  BOTTOM w0.127: JTG2.93 23.96,12.34 23.88,12.43 12.76,12.43 7.09,6.76 4.24,6.76 4.03,6.55 JTG1.166
BP.DATA_OUT_N<11>: length 36.4
  03_SIG1 w0.127: v1(30.79,11.13) 30.5,11.41 25.76,11.41 24.36,10.01 24.36,6.2 21.75,3.58 9.33,3.58 8.46,4.45 6.65,4.45 v1(6.43,4.22)
  BOTTOM w0.127: v1(6.43,4.22) 6.14,4.51 4.24,4.51 4.03,4.3 JTG1.169 ; v1(30.79,11.13) 30.47,11.44 29.7,11.44 29.59,11.34 JTG2.98
BP.DATA_OUT_P<0>: length 24.7
  BOTTOM w0.127: JTG1.135 4.02,29.8 4.28,29.54 6.75,29.54 13.53,22.76 23.88,22.76 23.96,22.84 JTG2.51
BP.DATA_OUT_P<1>: length 31.7
  03_SIG1 w0.127: v1(30.3,22.08) 30.04,21.81 14.17,21.81 8.65,27.34 7.36,27.34 v1(7.02,27.68)
  BOTTOM w0.127: JTG2.56 29.4,21.84 29.5,21.74 29.96,21.74 29.97,21.74 v1(30.3,22.08) ; JTG1.138 4.02,27.55 4.23,27.34 6.68,27.34 v1(7.02,27.68)
BP.DATA_OUT_P<2>: length 23.6
  BOTTOM w0.127: JTG1.141 4.02,25.3 4.23,25.09 6.02,25.09 10.35,20.76 23.88,20.76 23.96,20.84 JTG2.59
BP.DATA_OUT_P<3>: length 32.2
  03_SIG1 w0.127: v1(30.8,20.12) 30.5,19.83 27.68,19.83 27.42,20.09 21.46,20.09 20.82,19.45 11.53,19.45 8.06,22.91 6.67,22.91 v1(6.33,23.24)
  BOTTOM w0.127: JTG1.144 4.02,23.05 4.16,22.91 6,22.91 v1(6.33,23.24) ; v1(30.8,20.12) 30.44,19.77 29.66,19.77 29.59,19.84 JTG2.64
BP.DATA_OUT_P<4>: length 22.6
  BOTTOM w0.127: JTG2.67 23.96,18.84 23.88,18.76 8.39,18.76 6.55,20.6 4.35,20.6 4.22,20.6 4.02,20.8 JTG1.147
BP.DATA_OUT_P<5>: length 29.5
  03_SIG1 w0.127: v1(30.25,18.11) 29.95,17.82 24.15,17.82 23.66,18.31 6.84,18.31 v1(6.5,18.65)
  BOTTOM w0.127: JTG2.72 29.59,17.84 29.66,17.77 29.91,17.77 v1(30.25,18.11) ; v1(6.5,18.65) 6.19,18.34 4.23,18.34 4.02,18.55 JTG1.150
BP.DATA_OUT_P<6>: length 22
  BOTTOM w0.127: JTG2.75 23.96,16.84 23.88,16.76 18.4,16.76 17.83,16.18 4.14,16.18 4.02,16.3 JTG1.153
BP.DATA_OUT_P<7>: length 34.8
  03_SIG1 w0.127: v1(30.85,16.11) 30.5,15.76 28.47,15.76 27.57,16.66 21.3,16.66 20.8,16.17 7.99,16.17 6.59,14.77 6.59,13.46 v1(6.26,13.12)
  BOTTOM w0.127: JTG2.80 29.59,15.84 29.66,15.77 30.51,15.77 v1(30.85,16.11) ; JTG1.156 4.02,14.05 4.12,13.95 4.32,13.82 4.57,13.88 4.78,13.88 5.56,13.1 5.56,12.63 5.73,12.46 6.4,12.46 6.55,12.61 6.55,12.91 6.34,13.12 v1(6.26,13.12)
BP.DATA_OUT_P<8>: length 23.6
  BOTTOM w0.127: JTG1.159 4.02,11.8 4.23,11.59 7.72,11.59 11.37,15.24 21.49,15.24 21.98,14.76 23.88,14.76 23.96,14.84 JTG2.83
BP.DATA_OUT_P<9>: length 31.2
  03_SIG1 w0.127: v1(6.35,9.68) 6.68,9.34 9.43,9.34 12.23,12.14 24.33,12.14 25.99,13.79 29.95,13.79 v1(30.26,14.11)
  BOTTOM w0.127: v1(6.35,9.68) 6.01,9.34 4.23,9.34 4.02,9.55 JTG1.162 ; JTG2.88 29.59,13.84 29.66,13.77 29.93,13.77 v1(30.26,14.11)
BP.DATA_OUT_P<10>: length 24.4
  BOTTOM w0.127: JTG2.91 23.96,12.84 23.9,12.78 12.63,12.78 6.96,7.11 4.21,7.11 4.03,7.3 JTG1.165
BP.DATA_OUT_P<11>: length 36.5
  03_SIG1 w0.127: v1(6.43,5.19) 6.84,4.78 8.6,4.78 9.46,3.91 21.61,3.91 24.03,6.34 24.03,10.15 25.62,11.74 30.43,11.74 v1(30.79,12.09)
  BOTTOM w0.127: JTG2.96 29.59,11.84 29.66,11.77 30.47,11.77 v1(30.79,12.09) ; v1(6.43,5.19) 6.43,5.18 6.09,4.84 4.24,4.84 4.03,5.05 JTG1.168
BP.REF_CLK_N<0>: length 49.3
  TOP w0.127: v1(6.27,30.33) 5.96,30.01 5.96,29.65 5.57,29.26 4.25,29.26 4.04,29.05 JTG1.35
  07_SIG2 w0.127: v1(16.22,60.29) 15.9,60.61 13.8,60.61 8.03,54.84 8.03,33.56 5.96,31.49 5.96,30.65 v1(6.27,30.33)
  BOTTOM w0.127: v1(16.22,60.29) 16.54,60.61 17.15,60.61 18.16,59.6 23.88,59.6 23.96,59.52 JTG3.5
BP.REF_CLK_N<1>: length 59
  TOP w0.127: v1(6.11,28.43) 5.77,28.1 5.77,27.47 5.32,27.02 4.26,27.02 4.04,26.8 JTG1.32
  07_SIG2 w0.127: v1(6.11,28.43) 5.77,28.77 5.77,28.95 5.89,29.07 8.48,29.07 9.78,30.37 9.78,35.43 9.37,35.84 9.37,53.97 14.33,58.92 27.9,58.92 28.21,58.61 30.52,58.61 30.7,58.43 v1(30.7,58.26)
  BOTTOM w0.127: JTG3.10 29.59,58.52 29.68,58.6 30.36,58.6 v1(30.7,58.26)
BP.REF_CLK_N<2>: length 56.6
  TOP w0.127: JTG1.29 4.04,24.55 4.25,24.76 4.91,24.76 5.32,25.17 6.85,25.17 7.22,25.54 7.9,25.54 v1(8.22,25.22)
  07_SIG2 w0.127: v1(26.68,57.28) 26.36,57.6 24.85,57.6 24.58,57.87 15.47,57.87 13.67,56.06 13.67,27.28 12.76,26.37 10.11,26.37 9.28,25.54 8.54,25.54 v1(8.22,25.22)
  BOTTOM w0.127: v1(26.68,57.28) 26.36,57.6 25.98,57.6 25.89,57.52 JTG3.13
BP.REF_CLK_N<3>: length 62.2
  TOP w0.127: v1(10.15,24.11) 9.7,24.11 9.17,23.57 7.75,23.57 7.25,24.08 6.09,24.08 5.44,23.43 5.44,22.92 5.05,22.53 4.24,22.53 4.01,22.3 JTG1.26
  07_SIG2 w0.127: v1(30.21,56.29) 29.9,56.6 28,56.6 27.53,56.13 24.98,56.13 24.17,56.93 16.77,56.93 14.85,55.01 14.85,25.49 14.57,25.21 10.81,25.21 10.15,24.56 v1(10.15,24.11)
  BOTTOM w0.127: JTG3.18 29.59,56.52 29.68,56.6 29.9,56.6 v1(30.21,56.29)
BP.REF_CLK_N<4>: length 54.6
  TOP w0.127: JTG1.23 4.04,20.05 4.25,20.26 5.14,20.26 5.86,20.98 5.99,21.11 9.19,21.11 10.27,22.18 v1(10.72,22.18)
  07_SIG2 w0.127: v1(23.14,55.2) 22.83,55.52 21.67,55.52 21.16,56.03 18.01,56.03 16.11,54.12 16.11,24.69 15.42,24.01 12.09,24.01 10.72,22.63 v1(10.72,22.18)
  BOTTOM w0.127: JTG3.21 23.46,55.52 v1(23.14,55.2)
BP.REF_CLK_N<5>: length 65.8
  TOP w0.127: v1(8.72,19.75) 8.27,19.75 8.07,19.55 5.9,19.55 5.39,19.03 5.39,18.65 4.74,18.01 4.25,18.01 4.04,17.8 JTG1.20
  07_SIG2 w0.127: v1(8.72,19.75) 8.72,20.2 9.18,20.66 16.34,20.66 17.52,21.84 17.52,36.63 17.22,36.92 17.22,39.92 17.42,40.12 17.42,53.86 18.72,55.17 20.69,55.17 21.88,53.97 25.88,53.97 26.51,54.6 30.29,54.6 30.6,54.3 v1(30.78,54.3)
  BOTTOM w0.127: v1(30.78,54.3) 30.48,54.6 29.68,54.6 29.59,54.52 JTG3.26
BP.REF_CLK_N<6>: length 58.1
  TOP w0.127: v1(8.45,17.07) 8.11,16.73 8.11,16.32 7.52,15.72 4.04,15.72 3.87,15.55 JTG1.17
  07_SIG2 w0.127: v1(19.94,53.19) 19.94,53.3 19.7,53.53 19.04,53.53 18.61,53.11 18.61,40.13 18.16,39.67 18.16,38.15 18.61,37.69 18.61,21.11 15.59,18.08 8.61,18.08 8.11,17.59 8.11,17.41 v1(8.45,17.07)
  BOTTOM w0.127: v1(19.94,53.19) 20.26,53.52 JTG3.29
BP.REF_CLK_N<7>: length 67.2
  TOP w0.127: v1(8.5,14.13) 8.82,14.45 8.82,14.67 8.63,14.86 5.74,14.86 5.44,14.55 5.44,14.11 4.83,13.51 4.25,13.51 4.04,13.3 JTG1.14
  07_SIG2 w0.127: v1(8.5,14.13) 8.82,13.82 8.82,13.38 9.44,12.75 13.6,12.75 17.81,16.96 17.81,18.57 20.37,21.13 20.37,51.68 21.51,52.82 25.83,52.82 26.05,52.6 26.99,52.6 29.85,52.6 v1(30.19,52.27)
  BOTTOM w0.127: JTG3.34 29.59,52.52 29.68,52.6 29.85,52.6 v1(30.19,52.27)
BP.REF_CLK_N<8>: length 60.4
  TOP w0.127: JTG1.11 4.04,11.05 4.25,11.26 5.21,11.26 5.56,11.62 7.98,11.62 9.3,12.94 19.28,12.94 19.79,13.45 19.79,13.52 19.79,13.85 v1(20.13,14.19)
  07_SIG2 w0.127: v1(22.41,51.31) 22.41,51.33 22.09,51.65 21.79,51.65 21.26,51.12 21.26,20.45 19.8,18.99 19.8,14.52 v1(20.13,14.19)
  BOTTOM w0.127: JTG3.37 23.96,51.52 23.85,51.63 22.73,51.63 v1(22.41,51.31)
BP.REF_CLK_N<9>: length 70.3
  TOP w0.127: JTG1.8 3.72,8.8 3.9,8.97 5.07,8.97 5.48,9.39 5.48,10.21 5.88,10.6 8.67,10.6 10.13,12.06 21.19,12.06 21.66,12.54 21.66,13.33 v1(22,13.67)
  07_SIG2 w0.127: v1(30.77,50.23) 30.77,50.47 30.65,50.6 29.09,50.6 29.08,50.59 27.5,50.59 26.93,51.15 23.84,51.15 22.16,49.48 22.16,19.78 21.67,19.29 21.67,14 v1(22,13.67)
  BOTTOM w0.127: JTG3.42 29.59,50.52 29.68,50.6 30.41,50.6 v1(30.77,50.23)
BP.REF_CLK_N<10>: length 65.8
  TOP w0.127: v1(23.4,15.5) 23.03,15.13 23.03,11.58 22.55,11.09 10.44,11.09 6.61,7.27 5.6,7.27 5.09,6.76 4.26,6.76 4.05,6.55 JTG1.5
  07_SIG2 w0.127: v1(26.78,49.26) 26.78,49.28 26.44,49.63 23.98,49.63 23.03,48.68 23.03,15.87 v1(23.4,15.5)
  BOTTOM w0.127: JTG3.45 25.89,49.52 25.98,49.6 26.45,49.6 v1(26.78,49.26)
BP.REF_CLK_N<11>: length 73.6
  TOP w0.127: v1(22.48,9.16) 22.17,9.48 17.58,9.48 15.25,7.14 15.25,6 12.58,3.33 8.51,3.33 7.63,4.22 7.63,5.69 7.14,6.17 5.9,6.17 5.34,5.62 5.34,4.98 4.84,4.48 4.05,4.48 3.87,4.3 JTG1.2
  07_SIG2 w0.127: v1(22.48,9.16) 22.79,9.46 24.02,9.46 24.41,9.86 24.41,45.9 25.96,47.44 27.5,47.44 28.66,48.6 29.79,48.6 v1(30.11,48.28)
  BOTTOM w0.127: v1(30.11,48.28) 29.82,48.57 29.64,48.57 29.59,48.52 JTG3.50
BP.REF_CLK_P<0>: length 49.3
  TOP w0.127: v1(5.31,30.33) 5.63,30.01 5.63,29.79 5.43,29.59 4.25,29.59 4.04,29.8 JTG1.36
  07_SIG2 w0.127: v1(16.22,61.25) 15.9,60.94 13.65,60.94 7.7,54.99 7.7,33.7 5.63,31.62 5.63,30.65 v1(5.31,30.33)
  BOTTOM w0.127: JTG3.3 23.96,60.02 23.88,59.93 18.29,59.93 17.29,60.94 16.54,60.94 v1(16.22,61.25)
BP.REF_CLK_P<1>: length 59
  TOP w0.127: JTG1.33 4.04,27.55 4.24,27.35 5.18,27.35 5.44,27.61 5.44,28.1 v1(5.1,28.43)
  07_SIG2 w0.127: v1(5.1,28.43) 5.44,28.77 5.44,29.09 5.75,29.4 8.34,29.4 9.45,30.5 9.45,35.3 9.02,35.72 9.02,54.1 14.17,59.25 28.04,59.25 28.35,58.94 30.54,58.94 30.7,59.1 v1(30.7,59.27)
  BOTTOM w0.127: v1(30.7,59.27) 30.36,58.93 29.68,58.93 29.59,59.02 JTG3.8
BP.REF_CLK_P<2>: length 56.6
  TOP w0.127: v1(8.22,26.19) 7.9,25.87 7.08,25.87 6.71,25.5 5.18,25.5 4.77,25.09 4.25,25.09 4.04,25.3 JTG1.30
  07_SIG2 w0.127: v1(26.68,58.25) 26.36,57.93 24.98,57.93 24.72,58.2 15.33,58.2 13.34,56.2 13.34,27.42 12.62,26.7 9.98,26.7 9.14,25.87 8.54,25.87 v1(8.22,26.19)
  BOTTOM w0.127: v1(26.68,58.25) 26.36,57.93 25.98,57.93 25.89,58.02 JTG3.11
BP.REF_CLK_P<3>: length 63
  TOP w0.127: JTG1.27 4.05,23.05 4.24,22.86 4.91,22.86 5.11,23.06 5.11,23.56 5.95,24.41 7.38,24.41 7.89,23.9 9.03,23.9 9.47,24.34 v1(9.47,24.79)
  07_SIG2 w0.127: v1(9.47,24.79) 9.92,24.79 10.67,25.54 14.43,25.54 14.52,25.63 14.52,55.15 16.63,57.26 24.31,57.26 25.12,56.46 27.39,56.46 27.87,56.94 29.89,56.94 v1(30.21,57.26)
  BOTTOM w0.127: JTG3.16 29.59,57.02 29.68,56.93 29.89,56.93 v1(30.21,57.26)
BP.REF_CLK_P<4>: length 54.7
  TOP w0.127: v1(10.03,22.86) 10.03,22.41 9.87,22.25 9.06,21.44 5.85,21.44 5.01,20.59 4.25,20.59 4.04,20.8 JTG1.24
  07_SIG2 w0.127: v1(23.14,56.16) 22.83,55.85 21.8,55.85 21.29,56.36 17.87,56.36 15.77,54.26 15.77,24.83 15.28,24.34 11.95,24.34 10.48,22.86 v1(10.03,22.86)
  BOTTOM w0.127: v1(23.14,56.16) 23.46,55.85 23.79,55.85 23.96,56.02 JTG3.19
BP.REF_CLK_P<5>: length 65.8
  TOP w0.127: JTG1.21 4.04,18.55 4.25,18.34 4.61,18.34 5.06,18.79 5.06,19.17 5.76,19.88 7.93,19.88 8.04,19.98 v1(8.04,20.43)
  07_SIG2 w0.127: v1(30.78,55.26) 30.63,55.26 30.29,54.93 26.37,54.93 25.74,54.3 22.02,54.3 20.82,55.5 18.59,55.5 17.09,54 17.09,40.26 16.89,40.06 16.89,36.79 17.19,36.49 17.19,21.97 16.2,20.99 9.04,20.99 8.49,20.43 v1(8.04,20.43)
  BOTTOM w0.127: JTG3.24 29.59,55.02 29.68,54.93 30.45,54.93 v1(30.78,55.26)
BP.REF_CLK_P<6>: length 59
  TOP w0.127: JTG1.18 3.79,16.3 4.04,16.05 7.38,16.05 7.78,16.45 7.78,16.73 v1(7.45,17.07)
  07_SIG2 w0.127: v1(7.45,17.07) 7.78,17.41 7.78,17.72 8.47,18.41 15.45,18.41 18.28,21.24 18.28,37.56 17.83,38.01 17.83,39.81 18.28,40.26 18.28,53.25 18.9,53.86 19.7,53.86 19.94,54.1 v1(19.94,54.2)
  BOTTOM w0.127: v1(19.94,54.2) 20.29,53.85 23.79,53.85 23.96,54.02 JTG3.27
BP.REF_CLK_P<7>: length 67.2
  TOP w0.127: JTG1.15 4.04,14.05 4.25,13.84 4.69,13.84 5.1,14.25 5.1,14.69 5.6,15.19 8.84,15.19 9.15,14.88 9.15,14.45 v1(9.47,14.13)
  07_SIG2 w0.127: v1(9.47,14.13) 9.15,13.82 9.15,13.51 9.58,13.08 13.46,13.08 17.48,17.09 17.48,18.71 20.04,21.26 20.04,51.81 21.38,53.15 25.97,53.15 26.19,52.93 29.89,52.93 v1(30.19,53.23)
  BOTTOM w0.127: JTG3.32 29.59,53.02 29.68,52.93 29.89,52.93 v1(30.19,53.23)
BP.REF_CLK_P<8>: length 60.3
  TOP w0.127: v1(19.16,14.19) 19.46,13.89 19.46,13.59 19.14,13.27 9.16,13.27 7.84,11.95 5.42,11.95 5.07,11.59 4.25,11.59 4.04,11.8 JTG1.12
  07_SIG2 w0.127: v1(19.16,14.19) 19.47,14.5 19.47,19.13 20.93,20.59 20.93,51.25 21.65,51.98 22.12,51.98 v1(22.41,52.28)
  BOTTOM w0.127: JTG3.35 23.96,52.02 23.91,51.96 22.73,51.96 v1(22.41,52.28)
BP.REF_CLK_P<9>: length 71
  TOP w0.127: JTG1.9 3.65,9.55 3.9,9.3 4.94,9.3 5.15,9.52 5.15,10.35 5.74,10.93 8.54,10.93 10,12.39 21.01,12.39 21.33,12.71 21.33,13.33 v1(21,13.67)
  07_SIG2 w0.127: v1(21,13.67) 21.34,14.01 21.34,19.42 21.83,19.92 21.83,49.61 23.7,51.48 27.07,51.48 27.63,50.92 28.94,50.92 28.95,50.93 30.65,50.93 30.77,51.06 v1(30.77,51.24)
  BOTTOM w0.127: v1(30.77,51.24) 30.47,50.93 29.68,50.93 29.59,51.02 JTG3.40
BP.REF_CLK_P<10>: length 65.7
  TOP w0.127: JTG1.6 4.05,7.3 4.21,7.14 4.96,7.14 5.47,7.65 6.48,7.65 10.29,11.46 22.44,11.46 22.7,11.72 22.7,15.19 v1(22.4,15.5)
  07_SIG2 w0.127: v1(22.4,15.5) 22.7,15.8 22.7,48.82 23.84,49.96 26.47,49.96 v1(26.78,50.27)
  BOTTOM w0.127: v1(26.78,50.27) 26.45,49.93 25.98,49.93 25.89,50.02 JTG3.43
BP.REF_CLK_P<11>: length 72.4
  TOP w0.127: JTG1.3 3.81,5.05 4.01,4.85 4.7,4.85 4.96,5.11 4.96,5.74 5.72,6.5 7.3,6.5 7.96,5.84 7.96,4.4 8.64,3.71 12.48,3.71 14.92,6.15 14.92,7.28 17.45,9.81 22.16,9.81 v1(22.48,10.12)
  07_SIG2 w0.127: v1(22.48,10.12) 22.81,9.79 23.88,9.79 24.08,10 24.08,46.03 25.82,47.77 27.36,47.77 28.52,48.93 29.79,48.93 v1(30.11,49.25)
  BOTTOM w0.127: JTG3.48 29.59,49.02 29.64,48.97 29.82,48.97 v1(30.11,49.25)

## Copper pours and planes (outline as drawn; the poured copper is in the pictures)
GND on TOP: 0.63,66.69 0.87,66.92 9.8,66.92 10.96,67.39 11.44,68.55 11.44,69.47 32.03,69.47 32.03,0.64 11.44,0.64 11.44,1.56 10.95,2.71 9.8,3.18 0.86,3.18 0.63,3.41 ; 6 cut-outs
GND on BOTTOM, 02_GND, 04_GND, 05_PWR1, 06_GND, 08_GND, 09_SIG3: 0.63,66.69 0.87,66.92 9.8,66.92 10.96,67.39 11.44,68.55 11.44,69.47 32.03,69.47 32.03,0.64 11.44,0.64 11.44,1.56 10.95,2.71 9.8,3.18 0.86,3.18 0.63,3.41

## Text on the board
User.Comments: CR_SFP_V0_2 | CR_SFP_V0_3 | CR_CLK_FO_1
Ref Des/Silkscreen Top: MICRO-TCA INTERFACE BOARD (MIB) | JUNE 19 2020 | G MAYERS
PAGE_OUTLINE: GODWIN M. MAYERS | 06/19/20 | TEL: 215-898-6809 | EMAIL: MAYERS@HEP.UPENN.EDU | CONTACT: GODWIN M. MAYERS | 209 SOUTH 33RD STREET | PHILADELPHIA PA 19104 | 1 | MICRO-TCA INTERFACE BOARD (MIB) | 06/21/20
User.45: BOARD THICKNESS | FIGURE | FINISHED_SIZE | 10.0 | 12.0 | 14.0 | 33.465 | 35.0 | 37.402 | 39.0 | 39.37 | 40.0 | 41.339 | 62.0 | 84.0 | 105.984 | 125.984 | 130.0 | 23.622 | 31.496 | 57.087 | 60.0 | 61.024 | DRILL CHART: TOP to BOTTOM | ALL UNITS ARE IN MILS | TOLERANCE_DRILL | +0.0/-10.0 | +0.0/-12.012 | +0.0/-0.0 | +0.03/-0.03 | PLATED | NON-PLATED | QTY | 935 | 354 | 25 | 3 | 6 | 27 | 2 | 15 | 14 | 30 | 8 | 4 | 1 | 1. BOARD THICKNESS: 0.062 INCHES | 2. MATERIAL: FR4 (RoHS COMPLIANT MATERIAL) OR EQUIVALENT. GLASS | 3. ALL HOLES ARE PLATED THROUGH UNLESS OTHERWISE NOTED | 4. 100 OHM DIFFERENTIAL IMPEDENCE ON (TOP, 03_SIG1, 07_SIG2, 09_SIG3, AND BOTTOM) | 5. ALL TOLERANCES +/-3MILS EXCEPT WHERE NOTED | 6. BOARD EDGE CONNECTORS (DETAIL 1) MUST BE BEVELED FOR EASY INSERTION.  SELECTIVE HARD GOLD FINISH FOR EDGE CONTACTS | 7. BOARD HAS CUTOUT  SEE DETAIL 2 | 8. DESIGN CONSIST OF TWO (2) BOARDS THAT MUST BE PANELIZED WITH BREAKAWAYS FOR EASY SEPERATION | 9. PLEASE SEND US AN APPROPRIATE STACK-UP THAT WE CAN IMPORT INTO (ALLEGRO)CADENCE. | See layers HardGold_Top and HardGold_Bot for locations | BOARD NAME:MICRO-TCA INTERFACE BOARD (MIB)
